# Altium PCB User_Interface.PcbDoc
Units mm, origin at the board's own origin, x right, y up, seen from the top; angles counter-clockwise.
Board outline 200 x 135 mm, 2 copper layers (Top Layer, Bottom Layer); 66 components, 48 nets, 170 pads, 7 vias.
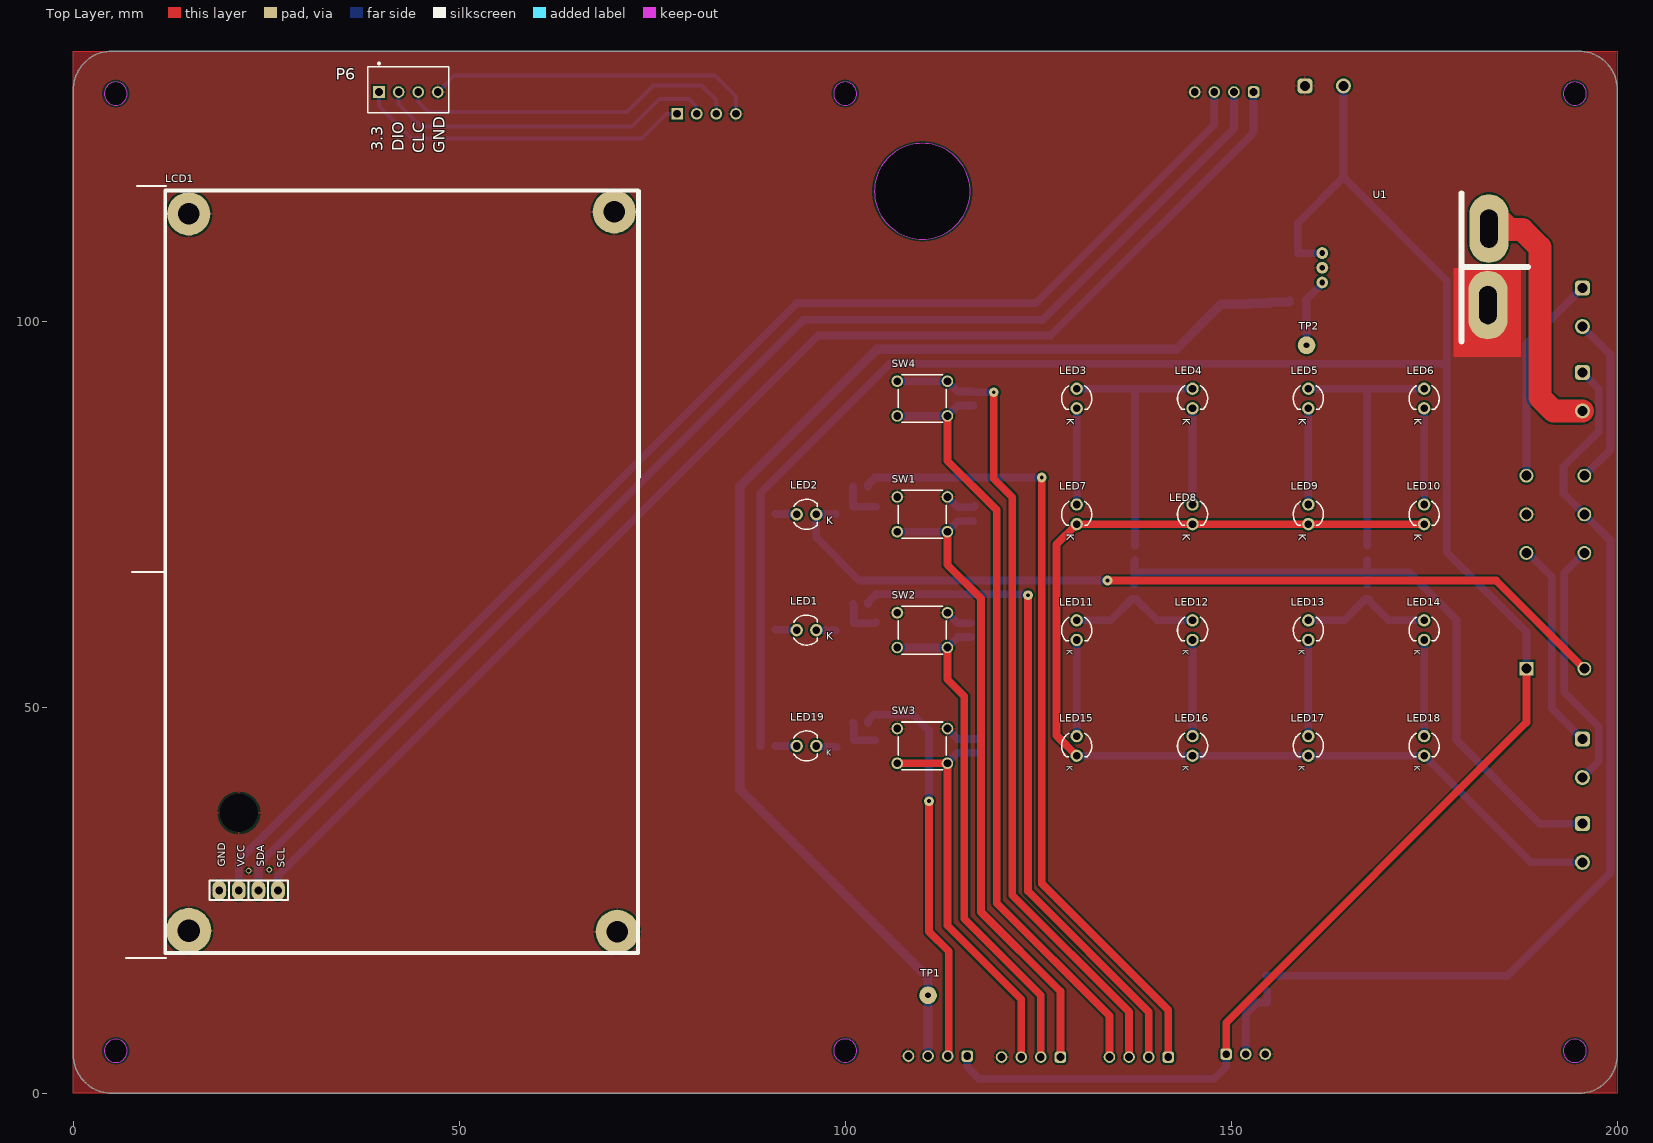
[diagram p0: Top Layer view]
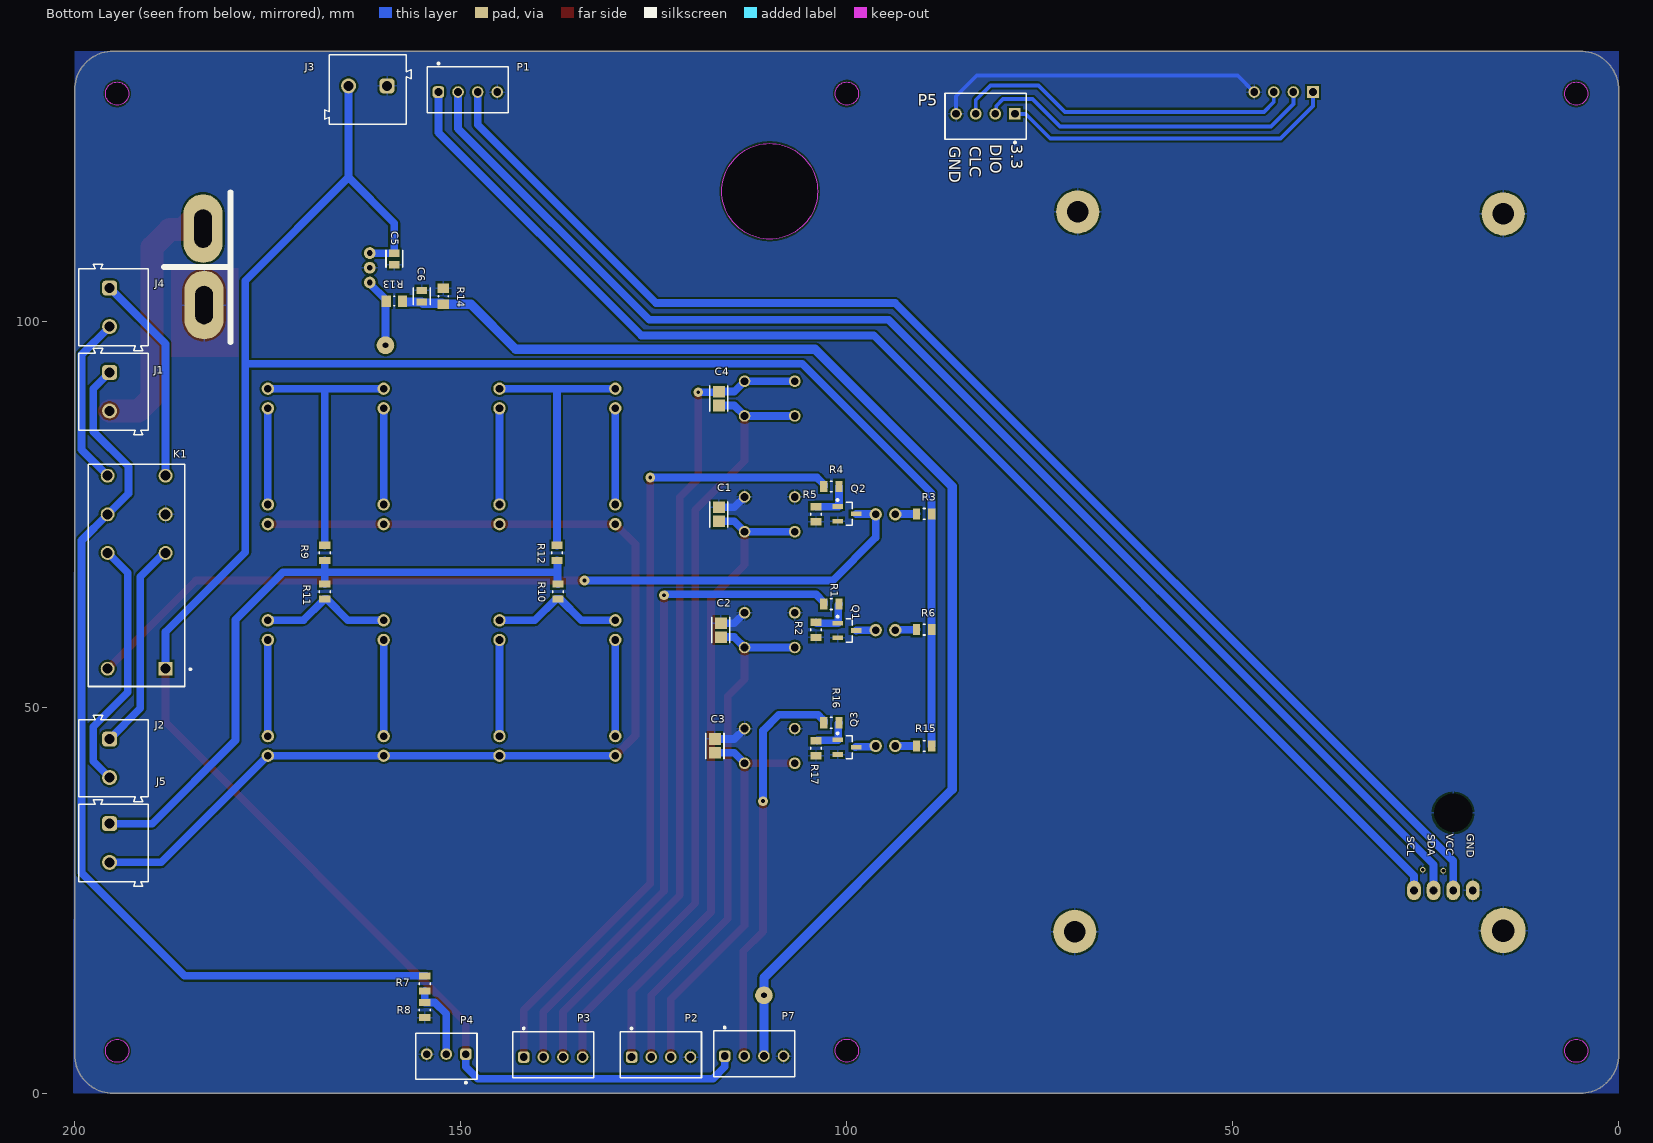
[diagram p1: Bottom Layer view, seen from below]
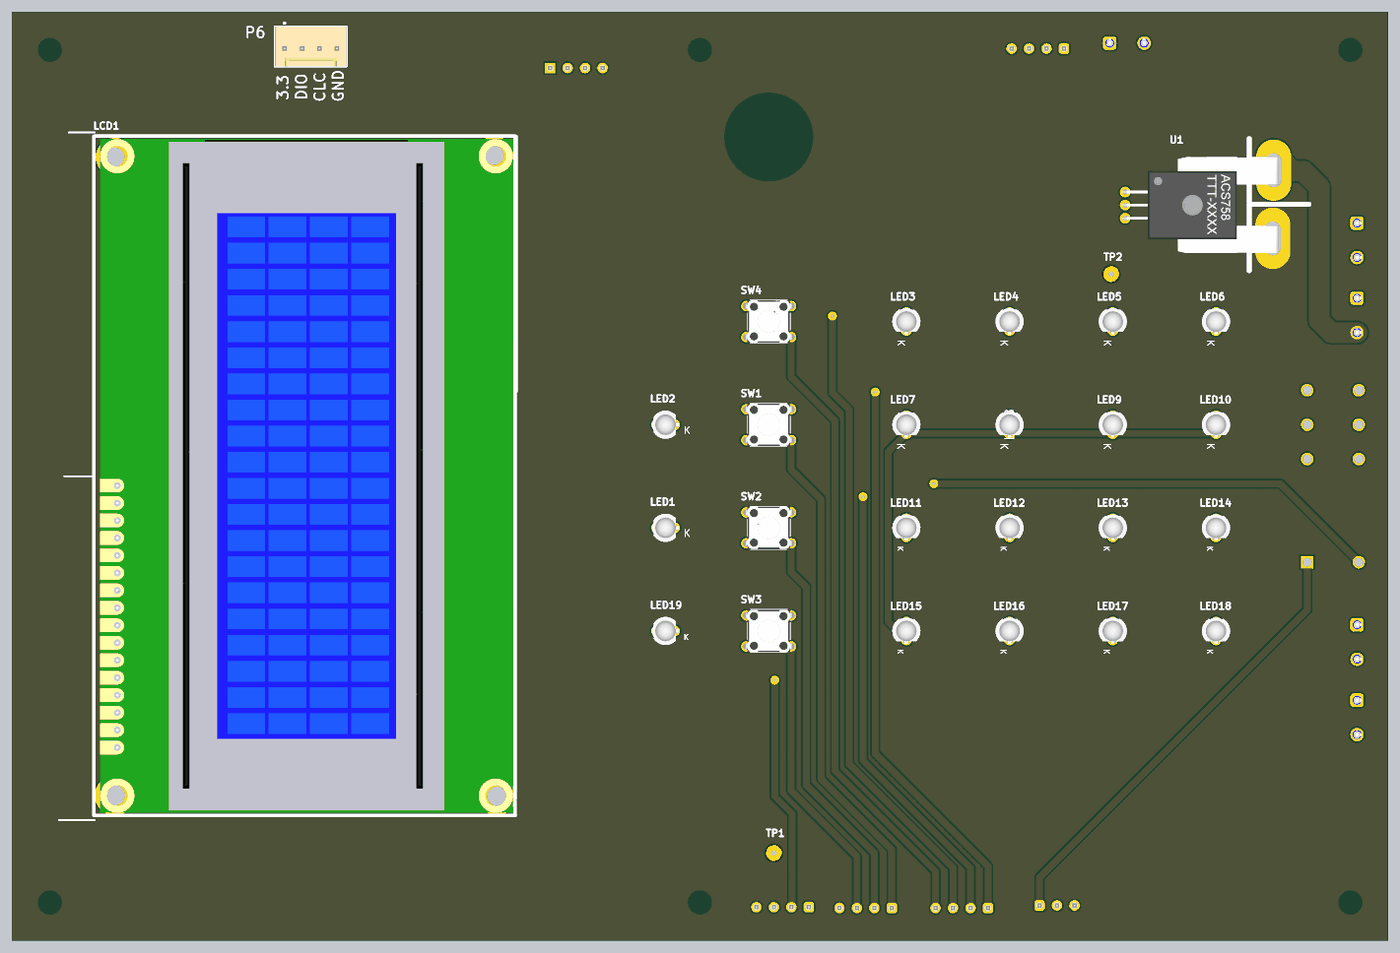
[diagram p2: 3D render of the assembled board from above, using the file's embedded part models]
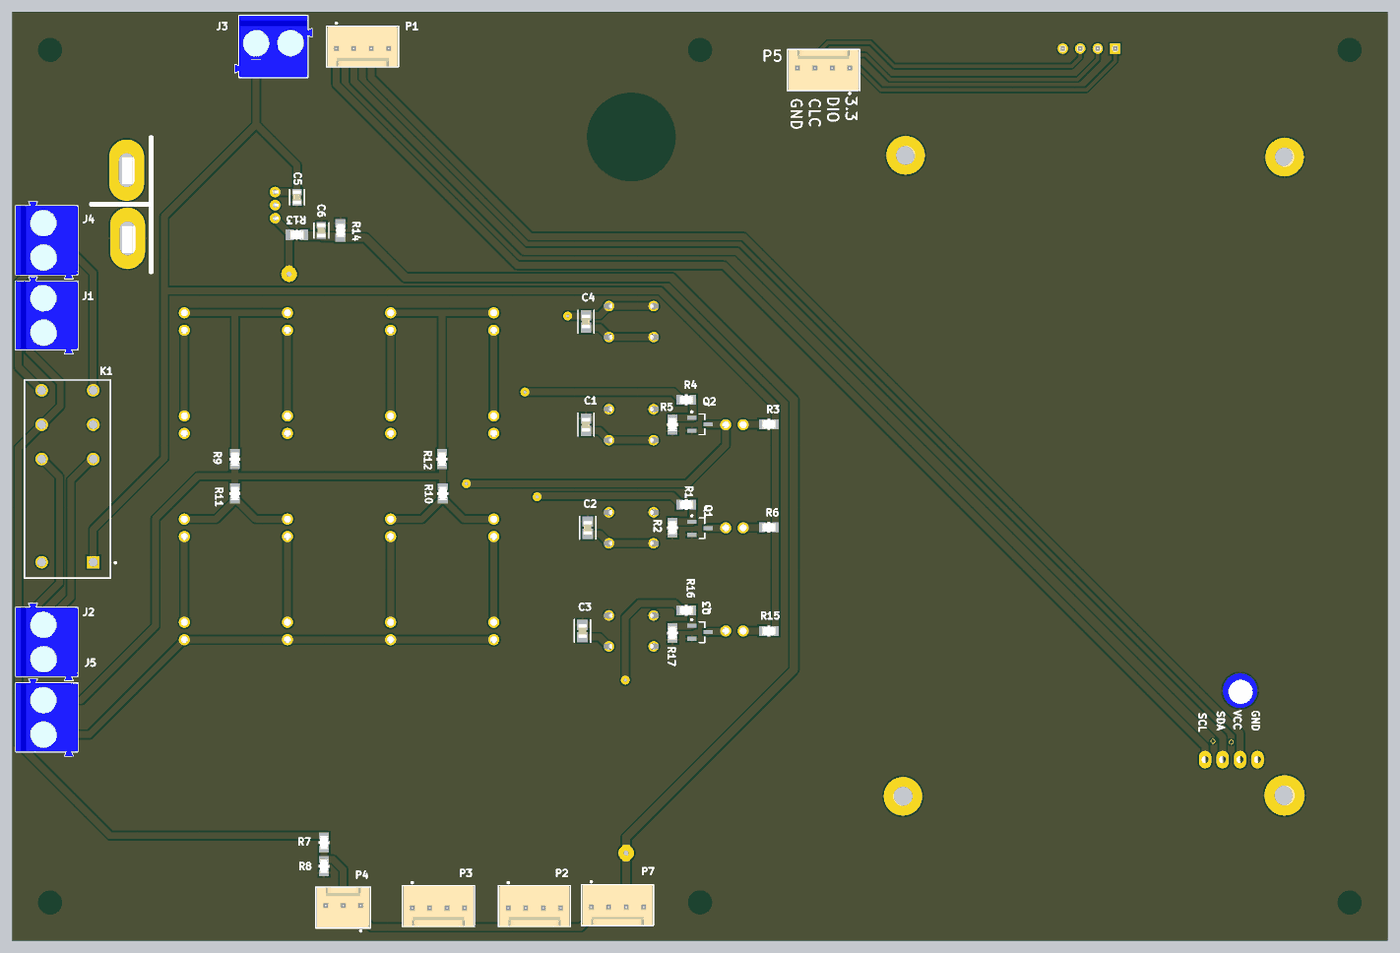
[diagram p3: 3D render of the assembled board from below, using the file's embedded part models]

## Layer stack, top to bottom
Top Solder: solder mask 0.0102, Solder Resist, Dk 3.5
Top Layer: signal copper 0.0356
Dielectric 1: dielectric 0.32, FR-4, Dk 4.8
Bottom Layer: signal copper 0.0356
Bottom Solder: solder mask 0.0102, Solder Resist, Dk 3.5

## Board outline
0.025,5 ccw(c5.025,5) 5.025,0 195.025,0 ccw(c195.025,5) 200.025,5 200.025,130 ccw(c195.025,130) 195.052,135 5.025,135 ccw(c5.025,130) 0.025,130
cut-out: 103.803,116.84 ccw(c110,116.84) 110,110.643 ccw(c110,116.84) 116.197,116.84 ccw(c110,116.84) 110,123.037 ccw(c110,116.84)
cut-out: 98.5,5.525 ccw(c100,5.525) 100,4.025 ccw(c100,5.525) 101.5,5.525 ccw(c100,5.525) 100,7.025 ccw(c100,5.525)
cut-out: 98.5,129.5 ccw(c100,129.5) 100,128 ccw(c100,129.5) 101.5,129.5 ccw(c100,129.5) 100,131 ccw(c100,129.5)
cut-out: 4.025,5.5 ccw(c5.525,5.5) 5.525,4 ccw(c5.525,5.5) 7.025,5.5 ccw(c5.525,5.5) 5.525,7 ccw(c5.525,5.5)
cut-out: 193.025,5.5 ccw(c194.525,5.5) 194.525,4 ccw(c194.525,5.5) 196.025,5.5 ccw(c194.525,5.5) 194.525,7 ccw(c194.525,5.5)
cut-out: 193.025,129.5 ccw(c194.525,129.5) 194.525,128 ccw(c194.525,129.5) 196.025,129.5 ccw(c194.525,129.5) 194.525,131 ccw(c194.525,129.5)
cut-out: 4.025,129.5 ccw(c5.525,129.5) 5.525,128 ccw(c5.525,129.5) 7.025,129.5 ccw(c5.525,129.5) 5.525,131 ccw(c5.525,129.5)

## Design rules (kind name [scope] priority, off if disabled: settings)
Clearance [All] p1: gap=0.254 ignorepadtopadclearanceinfootprint=FALSE except(0: Arc-Hole Track-Hole SMDPad-Hole THPad-Hole Via-Hole Fill-Hole Poly-Hole Region-Hole Text-Hole)
PlaneClearance [All] p1: clearance=0.2
PolygonConnect [All] p1: connectstyle=Relief reliefconductorwidth=0.254 reliefentries=4 polygonreliefangle="90 Angle" airgapwidth=0.254
RoomDefinition User_Interface [InComponentClass('User_Interface')] p1: confinementstyle=ConfineIn formatcopy=TRUE lockcomponents=FALSE outline -211.963,-11.303 226.06,-11.303 226.06,150.749 -211.963,150.749
RoutingVias [All] p1: holewidth=0.7 width=1.27 viastyle="Through Hole" minholewidth=0.7 minwidth=1.27 maxholewidth=0.7 maxwidth=1.27
SilkToSilkClearance [All] p1: silktosilkclearance=0.1
SilkToSolderMaskClearance [IsPad] p1: minsilkscreentomaskgap=0.05 clearancetoexposedcopper=FALSE
SolderMaskExpansion [All] p1: expansion=0 istentingtop=FALSE
Width [All] p1: maxlimit=5 minlimit=0.254 preferedwidth=0.5 minimp=50.000000 maximp=50.000000 favimp=50.000000
27 further rules are at their usual default settings.

## Components (designator, comment, footprint, x,y, rotation, side; value= is the part's Value field where it differs from the comment)
C1 "C0805C224K5RACTU" FP-C0805C-DN-IPC_A 116.586,75 r270 bottom locked value="0.22 μF"
C2 "C0805C224K5RACTU" FP-C0805C-DN-IPC_A 116.332,60 r270 bottom locked value="0.22 μF"
C3 "C0805C224K5RACTU" FP-C0805C-DN-IPC_A 117.094,45 r270 bottom locked value="0.22 μF"
C4 "C0805C224K5RACTU" FP-C0805C-DN-IPC_A 116.586,90 r90 bottom locked value="0.22 μF"
C5 "C0805C224K5RACTU" FP-C0805C-DN-MFG 158.623,108.077 r270 bottom value="0.22 μF"
C6 "0.22uF" FP-C0805C-DN-MFG 155.067,103.251 r270 bottom value="0.22 μF"
J1 "691101710002" 691101710002 195,90.892 r270 bottom
J2 "691101710002" 691101710002 195,43.394 r270 bottom
J3 "691101710002" 691101710002 162.052,130 r0 bottom locked
J4 "691101710002" 691101710002 195,101.814 r270 bottom
J5 "691101710002" 691101710002 195,32.425 r270 bottom
K1 "G2RL-24-DC24" OMRON-G2RL-24_V 192,67.5 r90 bottom
LCD1 "2004_I2C" LCD2004_I2C 49.911,84.836 r90 top locked
LED1 "151033BS03000" "Type 3mm" 95,60 r0 top locked
LED2 "151033BS03000" "Type 3mm" 95,75 r0 top locked
LED3 "151033BS03000" "Type 3mm" 130,90 r270 top
LED4 "151033BS03000" "Type 3mm" 145,90 r270 top
LED5 "151033BS03000" "Type 3mm" 160,90 r270 top
LED6 "151033BS03000" "Type 3mm" 175,90 r270 top
LED7 "151033BS03000" "Type 3mm" 130,75 r270 top
LED8 "151033BS03000" "Type 3mm" 145,75 r270 top
LED9 "151033BS03000" "Type 3mm" 160,75 r270 top
LED10 "151033BS03000" "Type 3mm" 175,75 r270 top
LED11 "151033BS03000" "Type 3mm" 130,60 r270 top
LED12 "151033BS03000" "Type 3mm" 145,60 r270 top
LED13 "151033BS03000" "Type 3mm" 160,60 r270 top
LED14 "151033BS03000" "Type 3mm" 175,60 r270 top
LED15 "151033BS03000" "Type 3mm" 130,45 r270 top
LED16 "151033BS03000" "Type 3mm" 145,45 r270 top
LED17 "151033BS03000" "Type 3mm" 160,45 r270 top
LED18 "151033BS03000" "Type 3mm" 175,45 r270 top
LED19 "151033BS03000" "Type 3mm" 95,45 r0 top locked
P1 "61900411121" 61900411121#1 149.098,130 r0 bottom locked
P2 "61900411121" 61900411121#1 124.079,5 r0 bottom locked
P3 "61900411121" 61900411121#1 138.049,5 r0 bottom locked
P4 "61900311121" 61900311121 151.892,4.78 r180 bottom
P5 "61900411121" 61900411121#2 82.042,126.573 r180 bottom
P6 "61900411121" 61900411121#2 43.434,130 r180 top locked
P7 "61900411121" 61900411121#1 112.014,5.126 r0 bottom
Q1 "BC847B" INF-SOT23_M 100,59.944 r180 bottom locked
Q2 "BC847B" INF-SOT23_M 100,75.057 r180 bottom locked
Q3 "BC847B" INF-SOT23_M 100,44.831 r180 bottom locked
R1 "1K" FP-CRCW0805-e3-MFG 102,63.373 r180 bottom locked
R2 "10K" FP-CRCW0805-e3-MFG 104,60.03 r90 bottom locked
R3 "200" FP-CRCW0805-e3-MFG 90,75.057 r180 bottom locked
R4 "1K" FP-CRCW0805-e3-MFG 102,78.613 r180 bottom locked
R5 "10K" FP-CRCW0805-e3-MFG 104,75.016 r90 bottom locked
R6 "200" FP-CRCW0805-e3-MFG 90,60.071 r180 bottom locked
R7 "10K" FP-CRCW0805-e3-MFG 154.686,14.224 r90 bottom
R8 "1K" FP-CRCW0805-e3-MFG 154.686,10.795 r90 bottom
R9 "200" FP-CRCW0805-e3-MFG 167.64,70 r270 bottom
R10 "200" FP-CRCW0805-e3-MFG 137.414,65 r90 bottom
R11 "200" FP-CRCW0805-e3-MFG 167.64,65 r90 bottom
R12 "200" FP-CRCW0805-e3-MFG 137.541,70 r270 bottom
R13 "10K" Vishay_CRCW0805-e3_IPC_A 158.623,102.616 r0 bottom
R14 "2.2K" Vishay_CRCW0805-e3_IPC_A 152.273,103.251 r270 bottom
R15 "200" FP-CRCW0805-e3-MFG 90,45 r180 bottom
R16 "1K" FP-CRCW0805-e3-MFG 102,48.006 r180 bottom locked
R17 "10K" FP-CRCW0805-e3-MFG 104,44.704 r90 bottom locked
SW1 "430156043726" 4301x60437x6 110,75 r0 top locked
SW2 "430156043726" 4301x60437x6 110,60 r0 top locked
SW3 "430156043726" 4301x60437x6 110,45 r0 top locked
SW4 "430156043726" 4301x60437x6 110,90 r180 top locked
TP1 "Test_Point_PCB" Test_Point 110.744,12.7 r0 top
TP2 "Test_Point_PCB" Test_Point 159.766,96.901 r0 top
U1 "ACS758" ACS758-100 171.577,106.807 r270 top

## Footprints (in the part's own frame and the unit in brackets; to place one, negate y for a bottom-side part, rotate by r counter-clockwise, add the part's x,y. Pads: shape width x height; smd on the part's side, far side on the other; paste and mask are expansions set on the pad)
4301x60437x6 [mm] "6x6mm Tact Switch, THT version"
  round 1.5 hole 1: A1(-3.25,2.25) A2(3.25,2.25) B1(-3.25,-2.25) B2(3.25,-2.25)
  silkscreen extent -3.1,-3.1 3.1,3.1, body extent -3.95,-3.1 3.95,3.1, height 4.35
61900311121 [mm] "2.54mm Male Locking Header, 3p"
  rrect50% 1.5x1.5 hole 1: 1(2.54,0.3)
  round 1.5 hole 1: 2(0,0.3) 3(-2.54,0.3)
  silkscreen extent -3.98,-3.52 3.98,2.98, body extent -3.81,-2.9 3.81,2.9, height 11.53
61900411121#1 [mm] "2.54mm Male Locking Header, 4p"
  rrect50% 1.5x1.5 hole 1: 1(3.81,0.3)
  round 1.5 hole 1: 2(1.27,0.3) 3(-1.27,0.3) 4(-3.81,0.3)
  silkscreen extent -5.25,-3.52 5.25,2.98, body extent -5.08,-2.9 5.08,2.9, height 11.53
61900411121#2 [mm] "2.54mm Male Locking Header, 4p"
  rect 1.5x1.5 hole 1: 1(3.81,0.3)
  round 1.5 hole 1: 2(1.27,0.3) 3(-1.27,0.3) 4(-3.81,0.3)
  silkscreen extent -5.25,-3.52 5.25,2.98, body extent -5.08,-2.9 5.08,2.9, height 11.53
691101710002 [mm] "5,00mm - modular - blue - Horizontal entry with pressure clamp - 12,6mm height - 02p"
  rrect50% 1.95x1.95 hole 1.3: 1(-2.5,-0.5)
  round 1.95 hole 1.3: 2(2.5,-0.5)
  silkscreen extent -5.6,-4.5 5.6,4.5, body extent -5.6,-4.5 5.6,4.5, height 12.65
ACS758-100 [mil]
  round 60 hole 30: 1(-80,-385) 2(-5,-385) 3(70,-385)
  oval 350x200 hole 90 slot 195 at 0 deg: 4(185,460) 5(-205,465)
  silkscreen extent -385,325 370,665, body extent -281,-404 271,492, height 280
FP-C0805C-DN-IPC_A [mm]
  rect 1.505x1.556 smd paste+0 mask+0: 1(-0.901,0) 2(0.901,0)
  silkscreen extent -1.65,-1.18 1.65,1.18, body extent -1,-0.63 1,0.63, height 0.88
FP-C0805C-DN-MFG [mm]
  rect 0.95x1.35 smd paste+0 mask+0: 1(-0.75,0) 2(0.75,0)
  silkscreen extent -1.1,-1.07 1.1,1.07, body extent -1,-0.63 1,0.63, height 0.88
FP-CRCW0805-e3-MFG [mm]
  rect 0.95x1.45 smd paste+0 mask+0: 1(-0.975,0) 2(0.975,0)
  silkscreen extent -0.13,-0.7 0.13,0.7, body extent -1,-0.63 1,0.63, height 0.5
INF-SOT23_M [mm] "SOT23, 3-Leads, Body 2.9x1.3 mm, Pitch 0.95 mm, IPC Low Density"
  rect 1.35x0.6 smd: 1(-1.2,0.95) 2(-1.2,-0.95) 3(1.2,0)
  silkscreen extent -1.33,-1.5 0.7,1.92, body extent -0.7,-1.5 0.7,1.5, height 1.1
LCD2004_I2C [mil]
  round 220 hole 110: 0(-2515,-810) 0(1145,1375) 0(1155,-795)
  round 230 hole 115: 0(-2510,1375)
  round 60 hole 196.85 unplated: 0(-1910,1120)
  oval 100x70 hole 40: 1(-2305,1220) 2(-2305,1120) 3(-2305,1020) 4(-2305,920)
  silkscreen extent -2625,-915 1265,1495, body extent -2610,-902 1248,1460, height 913
OMRON-G2RL-24_V [mm] "THD, 8-Leads, Body 28.8x12.5mm"
  rect 1.8x1.8 hole 1.3: 1(-12.5,-3.75)
  round 1.8 hole 1.3: 2(2.5,-3.75) 3(7.5,-3.75) 4(12.5,-3.75) 5(12.5,3.75) 6(7.5,3.75) 7(2.5,3.75) 8(-12.5,3.75)
  silkscreen extent -14.8,-7.1 14,6.25, body extent -14.8,-6.25 14,6.25, height 15.7
Test_Point [mil]
  round 90 hole 30 unplated paste+4 mask+4: 1(0,0)
"Type 3mm" [mm] "THT, LED-3mm, 2pin- Body 4.15mm(max)"
  round 1.6 hole 1: 1(1.27,0) 2(-1.27,0)
  silkscreen extent -1.66,-1.95 1.4,1.95, body extent -1.93,-1.94 1.87,1.94, height 10.5
Vishay_CRCW0805-e3_IPC_A [mil]
  rect 47.5x59.38 smd paste+0 mask+0: 1(-41.37,0) 2(41.37,0)
  silkscreen extent -3,-25 3,25, body extent -39,-25 39,25, height 20

## Part data
C1 C2 C3 C4 C5: library part CMP-1036-04552-2, "CAP CER 0.22UF 50V X7R 0805", Capacitance="0.22 μF", Manufacturer=KEMET, Package=C0805C-DN, Temperature="-55°C to +125°C", Temperature Characteristic=X7R, Temperature Coefficient=30ppm/°C, Temperature Range High=+125°C, Temperature Range Low=-55°C, Tolerance=0.1, Voltage Rating="50 V", Automotive=No, Category=Cap, ComponentLink2Description=Datasheet, ComponentLink2URL=https://content.kemet.com/datasheets/KEM_C1003_C0G_SMD.pdf, Device Class L1="Passive Components", Device Class L2=Capacitors, Device Class L3="Ceramic Capacitors", Digikey Description="CAP CER 0.22UF 50V X7R 0805", Height=0.88mm, Ipc Land Pattern Name=CAPC200125X78, Lead Free=Yes, Manufacturer Part Number=C0805C224K5RACTU, Material=Ceramic, Mouser Description="CAP CER 0.22UF 50V X7R 0805", Octopart=https://octopart.com/c0805c224k5ractu-kemet-144670, RoHS=TRUE
C6: library part CMP-1036-04552-2, "CAP CER 0.22UF 50V X7R 0805", Capacitance="0.22 μF", Manufacturer=KEMET, Manufacturer Part Number=C0805C224K5RACTU, Package=C0805C-DN, Temperature="-55°C to +125°C", Temperature Characteristic=X7R, Temperature Coefficient=30ppm/°C, Temperature Range High=+125°C, Temperature Range Low=-55°C, Tolerance=0.1, Voltage Rating="50 V", Automotive=No, Category=Cap, ComponentLink2Description=Datasheet, ComponentLink2URL=https://content.kemet.com/datasheets/KEM_C1003_C0G_SMD.pdf, Device Class L1="Passive Components", Device Class L2=Capacitors, Device Class L3="Ceramic Capacitors", Digikey Description="CAP CER 0.22UF 50V X7R 0805", Height=0.88mm, Ipc Land Pattern Name=CAPC200125X78, Lead Free=Yes, Material=Ceramic, Mouser Description="CAP CER 0.22UF 50V X7R 0805", Octopart=https://octopart.com/c0805c224k5ractu-kemet-144670, RoHS=TRUE
J1 J2 J3 J4 J5: "WR-TBL Series 101 Horizontal Entry Modular, THT, pitch 5mm, 2p", Manufacturer="Wurth Elektronik", Operating Temperature Max=105°C, Operating Temperature Min=-40°C, Rated Current=16A, Working Voltage=250V, Application="Pressure Clamp", Category="Terminal Blocks", ComponentLink1Description="Website Link", ComponentLink1URL=https://www.we-online.com/redexpert/article/691101710002?ad, ComponentLink2Description="Datasheet Link", ComponentLink2URL=https://www.we-online.com/redexpert/spec/691101710002?ad, Manufacturer Part Number=691101710002, Match Code=WR-TBL, Modularity=Yes, Mount="Through Hole", Number of Pins=2, Number of Rows=1, Orientation=Horizontal, Packaging=Box, Pitch=5mm
K1: library part CMP-2000-06305-1, "Low Profile Power Relay with 15.7 mm Height, Ideal for Incorporation in Miniature Equipment, 24 V, -40 to 85 degC, 8-Pin THD, RoHS, Bulk", Coil Current=16.7mA, Coil Resistance=1.44kOhms, Coil Voltage=24V, Manufacturer=Omron, Package Description="8-Pin Through Hole Device, Body 28.8 x 12.5 mm", Package Reference=G2RL-24, Power Consumption=400mW, Brand=OmronElectronics, Coil Type=Non-Latching, Contact Form=DPDT(2FormC), Contact Material=SilverNickel, Contact Termination=Pin, Datasheet URL=http://www.omron.com/ecb/products/pdf/en-g2rl.pdf, Datasheet Version=03/2016, Factory Pack Quantity=20, Height=15.7mm, Length=29mm, Manufacturer URL=http://www.omron.com/, Mounting Style=ThroughHole, Mounting Technology=ThroughHole, Product=PowerRelays, Product Category=GeneralPurposeRelays, RoHS=Details, Series=G2RL-2, Type=HighCurrent, Width=12.7mm
LCD1: library part LCD2004_I2C
LED1 LED2 LED3 LED4 LED5 LED6 LED7 LED8 LED9 LED10 LED11 LED12 LED13 LED14 LED15 LED16 LED17 LED18 LED19: "THT LED round mono-color waterclear, WL-TMRW , Blue", Emitting color=Blue, Manufacturer="Wuerth Elektronik", ComponentLink1Description="Manufacturer URL", ComponentLink1URL=http://www.we-online.com, ComponentLink2Description=Datasheet, ComponentLink2URL=http://katalog.we-online.de/pbs/datasheet/7448042001.pdfhttp://katalog.we-online.de/pbs/datasheet/7448042001.pdfhttp://katalog.we-online.de/pbs/datasheet/7448042001.pdfhttp://katalog.we-online.de/pbs/datasheet/151033BS03000.pdf, PackageReference="Type 3mm", PartNumber=151033BS03000
P1 P2 P3 P7: "WR-WTB THT Male Vertical Locking Header, pitch 2.54mm, 4pins", Contact Resistance=20mΩ, Manufacturer="Wurth Elektronik", Operating Temperature Max=105°C, Operating Temperature Min=-40°C, Rated Current=3A, Withstanding Voltage=1000VAC, Working Voltage=250VAC, Category="Wire-to-Board Connectors", ComponentLink1Description="Website Link", ComponentLink1URL=https://www.we-online.com/redexpert/article/61900411121?ad, ComponentLink2Description="Datasheet Link", ComponentLink2URL=https://www.we-online.com/redexpert/spec/61900411121?ad, Gender=Male, Height=11.5mm, Length=10.16mm, Manufacturer Part Number=61900411121, Match Code=WR-WTB, Mount="Through Hole", Number of Pins=4, Number of Rows=1, Orientation=Vertical, Packaging=Bag, Pitch=2.54mm, Width=5.8mm
P4: "WR-WTB THT Male Vertical Locking Header, pitch 2.54mm, 3pins", Contact Resistance=20mΩ, Manufacturer="Wurth Elektronik", Operating Temperature Max=105°C, Operating Temperature Min=-40°C, Rated Current=3A, Withstanding Voltage=1000VAC, Working Voltage=250VAC, Category="Wire-to-Board Connectors", ComponentLink1Description="Website Link", ComponentLink1URL=https://www.we-online.com/redexpert/article/61900311121?ad, ComponentLink2Description="Datasheet Link", ComponentLink2URL=https://www.we-online.com/redexpert/spec/61900311121?ad, Gender=Male, Height=11.5mm, Length=7.62mm, Manufacturer Part Number=61900311121, Match Code=WR-WTB, Mount="Through Hole", Number of Pins=3, Number of Rows=1, Orientation=Vertical, Packaging=Bag, Pitch=2.54mm, Width=5.8mm
P5 P6: "WR-WTB THT Male Vertical Locking Header, pitch 2.54mm, 4p", Contact Resistance=20mOhm, Operating Temperature="-40 to +105degC", Rated Current=3A, Withstanding Voltage=1000VAC, Working Voltage=250VAC, ComponentLink1Description=Manufacturer, ComponentLink1URL=http://www.we-online.de, ComponentLink2Description=Datasheet, ComponentLink2URL=https://www.we-online.com/catalog/datasheet/61900411121.pdf, Gender=Male, Mounting Technology=THT, Packaging=Bag, Part Number=61900411121, Pin Number=4, Pitch=2.54mm, Published Date="January 2020", Publisher="Wurth Elektronik", Type=Vertical
Q1 Q2 Q3: library part CMP-1177-00042-1, "NPN Silicon AF Transistor, 45 V VCEO, 100 mA IC, SOT23, Reel, Green", Manufacturer=Infineon, ComponentLink1Description="Manufacturer URL", ComponentLink1URL=http://www.infineon.com/, ComponentLink2Description=Datasheet, ComponentLink2URL=http://www.infineon.com/dgdl/bc847series_bc848series_bc849series_bc850series.pdf?folderId=db3a304314dca389011541d30fa21656&fileId=db3a304314dca389011541d4630a1657, ComponentLink3Description="Package Specification", ComponentLink3URL=http://www.infineon.com/dgdl/SOT23-Package_Overview.pdf?folderId=db3a30431936bc4b0119532290053c66&fileId=db3a30431936bc4b0119533468123c85, fT (typ)="250Â MHz", Green=TRUE, IBM (max)="200Â mA", IC (max)="100Â mA", ICBO (max)="15Â nA", ICM (max)="200Â mA", Mounting Technology="Surface Mount", PackageDescription="3-Pin Small Outline Transistor Package, 1.3 x 2.9 mm Body, 0.95 mm Pitch", PackageReference=SOT23, PackageVersion=Apr-08, Packing=Reel, PartNumber=BC847B, Polarity=NPN, Ptot (max)="330Â mW", VCBO (max)="50Â V", VCEO (max)="45Â V", VEBO (max)="6Â V"
R1 R2 R5 R7 R16 R17: library part CMP-2001-04908-2, "RES Thick Film, 10kΩ, 1%, 0.125W, 100ppm/°C, 0805", Case Code (Imperial)=0805, Case Code (Metric)=2012, Max Operating Temperature=155°C, Min Operating Temperature=-55°C, Package Quantity=5000, Power Rating=125mW, Resistance=10kR, Temperature Coefficient=100ppm/°C, Tolerance=1%, Voltage Rating=150V, Case/Package=0805, Composition="Thick Film", Contact Plating=Tin, Depth=1.25mm, Height=0.45mm, Lead Free="Lead Free", Length=2mm, Military Standard=Not, Packaging="Tape and Reel", Radiation Hardening=No, Termination=SMD/SMT, Voltage Rating (DC)=150V, Weight=0.000194oz, Width=1.25mm
R3 R6 R9 R10 R11 R12 R15: library part CMP-2001-04908-2, "RES Thick Film, 200Ω, 1%, 0.125W, 100ppm/°C, 0805", Case Code (Imperial)=0805, Case Code (Metric)=2012, Max Operating Temperature=155°C, Min Operating Temperature=-55°C, Package Quantity=5000, Power Rating=125mW, Resistance=10kR, Temperature Coefficient=100ppm/°C, Tolerance=1%, Voltage Rating=150V, Case/Package=0805, Composition="Thick Film", Contact Plating=Tin, Depth=1.25mm, Height=0.45mm, Lead Free="Lead Free", Length=2mm, Military Standard=Not, Packaging="Tape and Reel", Radiation Hardening=No, Termination=SMD/SMT, Voltage Rating (DC)=150V, Weight=0.000194oz, Width=1.25mm
R4 R8: library part CMP-2001-04908-2, "RES Thick Film, 1kΩ, 1%, 0.125W, 100ppm/°C, 0805", Case Code (Imperial)=0805, Case Code (Metric)=2012, Max Operating Temperature=155°C, Min Operating Temperature=-55°C, Package Quantity=5000, Power Rating=125mW, Resistance=10kR, Temperature Coefficient=100ppm/°C, Tolerance=1%, Voltage Rating=150V, Case/Package=0805, Composition="Thick Film", Contact Plating=Tin, Depth=1.25mm, Height=0.45mm, Lead Free="Lead Free", Length=2mm, Military Standard=Not, Packaging="Tape and Reel", Radiation Hardening=No, Termination=SMD/SMT, Voltage Rating (DC)=150V, Weight=0.000194oz, Width=1.25mm
R13 R14: library part RC0805FR-07100KL
SW1 SW2 SW3 SW4: "WS-TATV THT Tact Switch 6x6mm, SPST-NO, 12VDC, 50mA, 260g", Manufacturer="Wurth Elektronik", Operating Temperature Max=85°C, Operating Temperature Min=-40°C, Rated Current=50mA, Rated Voltage=12VDC, Category="Tact Switches", Circuit=SPST-NO, ComponentLink1Description="Website Link", ComponentLink1URL=https://www.we-online.com/redexpert/article/430156043726?ad, ComponentLink2Description="Datasheet Link", ComponentLink2URL=https://www.we-online.com/redexpert/spec/430156043726?ad, Contact Material="Stainless Steel", Contact Plating=Silver, Height=4.3mm, Length=6mm, Manufacturer Part Number=430156043726, Match Code=WS-TATV, Mount="Through Hole", Operation Force=260g, Packaging=Bulk, Terminal Material="Copper Alloy", Terminal Plating=Silver, Washable=No, Width=6mm
TP1 TP2: library part TP_PCB?, "Test_Point"

## Via types
v1: diameter 1.27, hole 0.5, Top Layer to Bottom Layer, 5 vias
v2: diameter 0.7, hole 0.5, Top Layer to Bottom Layer, 2 vias

## Nets (pads, with @x,y where several pads share a name; then routed paths per layer and width w, separated by ;. In a path a pad name is that pad's centre, name@x,y a point inside that pad or via, vN(x,y) a via of type N, cw(c..) or ccw(c..) an arc to the next point about the centre after c; other vN are vias at no path point)
+5: C5.1 J3.2 K1.1 P4.1 P7.1 R3.2 R6.2 R15.2 U1.1 | length 333.2
  Top Layer w1: P4.1 149.352,9.144 188.25,48.042 K1.1
  Bottom Layer w1: R15.2 R6.2 R3.2 89.025,77.722 105.791,94.488 177.927,94.488 ; P7.1 115.826,4.824 115.826,3.427 117.348,1.905 147.828,1.905 149.352,3.429 P4.1 ; U1.1 161.792,108.833 158.629,108.833 C5.1 158.623,112.714 164.552,118.643 ; J3.2 164.552,118.643 ; K1.1 188.25,59.781 177.927,70.104 177.927,94.488 ; 164.552,118.643 177.927,105.267 177.927,94.488
GND: C1.1 C2.1 C3.1 C5.2 C6.1 J3.1 K1.3 LCD1.0 LCD1.1 P1.4 P2.4 P4.3 P5.4 P6.4 P7.4 Q1.2 Q2.2 Q3.2 R2.1 R5.1 R8.1 R14.1 R17.1 SW1.A1 SW1.A2 SW2.A1 SW2.A2 SW3.A1 SW3.A2 U1.2 U1.4 | length 55.1
  Bottom Layer w0.5: P6.4 49.37,131.826 83.185,131.826 85.852,129.159 P5.4
  Bottom Layer w1: SW3.A2 114.599,45.901 C3.1 ; SW2.A2 114.599,60.901 C2.1 ; SW1.A2 114.599,75.901 C1.1 C1.1@116.758,76.073
  other v2: 22.733,28.829 25.4,28.956
NetC1_2: C1.2 P2.1 SW1.B1 SW1.B2 | length 84.5
  Top Layer w1: SW1.B2 113.25,68.487 117.602,64.135 117.602,23.495 127.889,13.208 P2.1
  Bottom Layer w1: SW1.B1 SW1.B2 114.599,74.099 C1.2
NetC2_2: C2.2 P2.2 SW2.B1 SW2.B2 | length 68.2
  Top Layer w1: SW2.B2 113.25,53.628 115.443,51.435 115.443,22.606 125.349,12.7 P2.2
  Bottom Layer w1: SW2.B1 SW2.B2 114.599,59.099 C2.2
NetC3_2: C3.2 P2.3 SW3.B1 SW3.B2 | length 52.9
  Top Layer w1: SW3.B1 SW3.B2 113.25,21.751 122.809,12.192 P2.3
  Bottom Layer w1: SW3.B2 114.599,44.099 C3.2
NetC4_1: C4.1 P3.4 SW4.A1 SW4.A2 | length 102.1
  Top Layer w1: SW4.A1 113.25,81.949 119.634,75.565 119.634,24.638 134.239,10.033 P3.4
  Bottom Layer w1: SW4.A2 SW4.A1 114.599,89.099 C4.1
NetC4_2: C4.2 P3.3 SW4.B1 SW4.B2 | length 106.5
  Top Layer w1: v1(119.253,90.805) 119.253,79.629 121.666,77.216 121.666,25.654 136.779,10.541 P3.3
  Bottom Layer w1: SW4.B2 SW4.B1 114.599,90.901 C4.2 116.682,90.805 v1(119.253,90.805)
NetC6_2: C6.2 P7.3 R13.1 R14.2 TP1.1 | length 165
  Bottom Layer w1.2: P7.3 TP1.1 110.744,14.986 86.36,39.37 86.36,78.613 104.14,96.393 142.875,96.393 148.682,102.2 R14.2 152.423,102.351 154.917,102.351 C6.2 157.457,102.501 R13.1
NetJ1_1: J1.1 K1.6 R7.2 | length 120.3
  Bottom Layer w1: R7.2@154.467,15.24 185.801,15.24 199.136,28.575 199.136,71.614 K1.6 193.04,77.71 193.04,81.153 197.612,85.725 197.612,91.28 J1.1
NetJ1_2: J1.2 U1.5 | length 32.8
  Top Layer w3: U1.5@184.476,113.484 186.073,111.887 187.706,111.887 189.992,109.601 189.992,90.149 191.749,88.392 J1.2
NetJ2_1: J2.1 K1.2 | length 27.2
  Bottom Layer w1: K1.2 188.445,70 191.516,66.929 191.516,49.878 J2.1
NetJ2_2: J2.2 K1.7 | length 32.9
  Bottom Layer w1: J2.2 197.612,43.006 197.612,47.498 193.167,51.943 193.167,67.417 K1.7
NetJ4_1: J4.1 K1.4 | length 27.3
  Bottom Layer w1: K1.4 188.25,97.064 J4.1
NetJ4_2: J4.2 K1.5 | length 22.2
  Bottom Layer w1: J4.2 199.136,95.678 199.136,83.386 K1.5
NetJ5_1: J5.1 R9.2 R10.2 R11.2 R12.2 | length 86.8
  Bottom Layer w1: R10.2 137.477,66.038 137.477,67.5 ; R12.2 137.477,68.962 137.477,67.5 ; R11.2 167.64,67.5 ; R9.2 167.64,67.5 ; J5.1 189.992,34.925 179.197,45.72 179.197,61.341 173.038,67.5 167.64,67.5 ; 137.477,67.5 167.64,67.5
NetJ5_2: J5.2 LED7.1 LED8.1 LED9.1 LED10.1 LED15.1 LED16.1 LED17.1 LED18.1 | length 148.4
  Top Layer w1: LED15.1 127.381,46.349 127.381,71.111 LED7.1 LED8.1 LED9.1 LED10.1
  Bottom Layer w1: LED15.1 LED16.1 LED17.1 LED18.1 188.805,29.925 J5.2
NetK1_8: K1.8 LED2.1 Q2.3 | length 112.1
  Top Layer w1: v1(133.985,66.421) 184.329,66.421 K1.8
  Bottom Layer w1: Q2.3 98.771,75.028 96.298,75.028 LED2.1 96.27,72.005 101.854,66.421 v1(133.985,66.421)
NetLCD1_2: LCD1.2 P1.3 | length 173.9
  Bottom Layer w1: LCD1.2 21.463,30.099 93.726,102.362 124.714,102.362 147.828,125.476 P1.3
NetLCD1_3: LCD1.3 P1.2 | length 173.9
  Bottom Layer w1: LCD1.3 24.003,29.591 94.615,100.203 125.603,100.203 150.368,124.968 P1.2
NetLCD1_4: LCD1.4 P1.1 | length 173.4
  Bottom Layer w1: LCD1.4 26.543,28.194 96.52,98.171 126.619,98.171 152.908,124.46 P1.1
NetLED1_1: LED1.1 Q1.3 | length 2.6
  Bottom Layer w1: LED1.1 96.298,59.972 98.772,59.972 Q1.3
NetLED1_2: LED1.2 R6.1 | length 2.8
  Bottom Layer w1: R6.1 91.01,60.036 93.694,60.036 LED1.2
NetLED2_2: LED2.2 R3.1 | length 2.8
  Bottom Layer w1: R3.1 91.004,75.028 93.702,75.028 LED2.2
NetLED3_1: LED3.1 LED7.2 | length 12.5
  Bottom Layer w1: LED7.2 LED3.1
NetLED3_2: LED3.2 LED4.2 R12.1 | length 35.3
  Bottom Layer w1: LED3.2 137.5,91.27 ; R12.1 137.541,91.229 137.5,91.27 ; LED4.2 137.5,91.27
NetLED4_1: LED4.1 LED8.2 | length 12.5
  Bottom Layer w1: LED8.2 LED4.1
NetLED5_1: LED5.1 LED9.2 | length 12.5
  Bottom Layer w1: LED9.2 LED5.1
NetLED5_2: LED5.2 LED6.2 R9.1 | length 35.4
  Bottom Layer w1: LED5.2 167.5,91.27 ; R9.1 167.64,91.13 167.5,91.27 ; LED6.2 167.5,91.27
NetLED6_1: LED6.1 LED10.2 | length 12.5
  Bottom Layer w1: LED10.2 LED6.1
NetLED11_1: LED11.1 LED15.2 | length 12.5
  Bottom Layer w1: LED15.2 LED11.1
NetLED11_2: LED11.2 LED12.2 R10.1 | length 17.3
  Bottom Layer w1: LED11.2 134.409,61.27 137.164,64.025 R10.1 137.664,64.025 140.419,61.27 LED12.2
NetLED12_1: LED12.1 LED16.2 | length 12.5
  Bottom Layer w1: LED16.2 LED12.1
NetLED13_1: LED13.1 LED17.2 | length 12.5
  Bottom Layer w1: LED17.2 LED13.1
NetLED13_2: LED13.2 LED14.2 R11.1 | length 17.2
  Bottom Layer w1: LED13.2 164.635,61.27 167.39,64.025 R11.1 ; R11.1@167.865,64 167.865,63.8 170.395,61.27 LED14.2
NetLED14_1: LED14.1 LED18.2 | length 12.5
  Bottom Layer w1: LED18.2 LED14.1
NetLED19_1: LED19.1 Q3.3 | length 2.7
  Bottom Layer w1: LED19.1 96.389,44.881 98.826,44.881 Q3.3@98.876,44.831
NetLED19_2: LED19.2 R15.1 | length 2.8
  Bottom Layer w1: R15.1 LED19.2
NetP3_1: P3.1 R4.1 | length 105
  Top Layer w1: v1(125.476,79.756) 125.476,27.178 141.859,10.795 P3.1
  Bottom Layer w1: R4.1 102.975,78.863 103.2,79.088 103.868,79.756 v1(125.476,79.756)
NetP3_2: P3.2 R1.1 | length 87.7
  Top Layer w1: v1(123.698,64.516) 123.698,26.162 139.319,10.541 P3.2
  Bottom Layer w1: R1.1 102.975,63.623 103.995,64.643 123.571,64.643 v1(123.698,64.516)
NetP4_2: P4.2 R7.1 R8.2 | length 10.1
  Bottom Layer w1: P4.2 151.892,10.287 153.375,11.77 R8.2 R7.1
NetP5_1: P5.1 P6.1 | length 43.5
  Bottom Layer w0.5: P6.1 39.624,127.889 43.815,123.698 73.66,123.698 76.835,126.873 P5.1
NetP5_2: P5.2 P6.2 | length 44.2
  Bottom Layer w0.5: P6.2 42.164,128.143 45.085,125.222 72.39,125.222 75.946,128.778 79.756,128.778 80.656,127.878 80.656,126.989 P5.2
NetP5_3: P5.3 P6.3 | length 44.4
  Bottom Layer w0.5: P6.3 44.704,128.397 45.974,127.127 71.755,127.127 75.184,130.556 81.407,130.556 83.312,128.651 P5.3
NetP7_2: P7.2 R16.1 | length 52.8
  Top Layer w1: v1(110.871,37.846) 110.871,20.955 113.411,18.415 113.411,5.307 113.38,5.275 P7.2@113.38,4.595
  Bottom Layer w1: R16.1 102.975,48.256 103.2,48.481 103.741,49.022 108.839,49.022 110.871,46.99 v1(110.871,37.846)
NetQ1_1: Q1.1 R1.2 R2.2 | length 5.4
  Bottom Layer w1: R1.2 101.113,63.285 101.113,60.944 101.163,60.894 103.889,60.894 R2.2
NetQ2_1: Q2.1 R4.2 R5.2 | length 5.6
  Bottom Layer w1: R4.2 101.025,76.057 101.075,76.007 Q2.1 101.208,75.999 103.992,75.999 R5.2
NetQ3_1: Q3.1 R16.2 R17.2 | length 5
  Bottom Layer w1: R16.2 101.113,47.918 101.113,45.831 101.163,45.781 Q3.1 ; Q3.1@101.276,45.781 101.326,45.731 103.834,45.731 R17.2@103.886,45.679
NetR13_2: R13.2 TP2.1 U1.3 | length 9
  Bottom Layer w1: TP2.1 159.766,102.524 R13.2 159.674,102.767 161.798,104.891 U1.3

## Polygon pours and split planes (outlines as drawn)
no net on Top Layer "NONET_L01_P001" (solid, remove dead copper, pour order 1): 0,0 0,135 200.025,135 200.025,0
GND on Top Layer "GND_L01_P000" (solid, remove dead copper, pour order 0): 0,0 0,135.001 199.898,135.001 199.898,0
GND on Bottom Layer "GND_L02_P00211" (solid, remove dead copper, pour order 2): 0,0 0,135 200.025,135 200.228,0

## Other copper
Top Layer:
  rectangle net GND: 178.816,95.377 187.579,106.934

## Silkscreen, mask and mechanical layers (free items; w line width, h text height)
Top Overlay:
  lines w0.254: 6.858,17.5 12.027,17.5 ; 7.62,67.5 11.938,67.5 ; 8.255,117.5 12.027,117.5 ; 73.241,18.415 73.241,20.358 ; 73.406,79.794 73.406,116.967
  text "3.3" at 40.132,122.047 h1.52 r90
  text "DIO" at 42.799,122.047 h1.52 r90
  text "CLC" at 45.466,121.793 h1.52 r90
  text "GND" at 48.133,121.793 h1.52 r90
Bottom Overlay:
  text "3.3" at 78.74,122.936 h1.52 r90
  text "DIO" at 81.407,122.936 h1.52 r90
  text "CLC" at 84.074,122.682 h1.52 r90
  text "GND" at 86.741,122.682 h1.52 r90
Mechanical 1:
  circle w0.013: c100,129.5 r1.5
  circle w0.013: c100,5.525 r1.5
  circle w0.254: c110,116.84 r6.197
  circle w0.013: c5.525,5.5 r1.5
  circle w0.013: c194.525,5.5 r1.5
  circle w0.013: c5.525,129.5 r1.5
  circle w0.013: c194.525,129.5 r1.5
  pour cut-out: 4.025,129.5 ccw(c5.525,129.5) 5.525,128 ccw(c5.525,129.5) 7.025,129.5 ccw(c5.525,129.5) 5.525,131 ccw(c5.525,129.5)
  lines w0.013: 195.025,0 ccw(c195.025,5) 200.025,5 200.025,130 ccw(c195.025,130) 195.052,135 5.025,135 ccw(c5.025,130) 0.025,130 0.025,5 ccw(c5.025,5) 5.025,0 195.05,0

## Text inside footprints (layer, text, board x,y; h text height)
LCD1: Top Overlay "GND" at 19.685,29.337 h1 r90; Top Overlay "VCC" at 22.225,29.337 h1 r90; Top Overlay "SDA" at 24.765,29.337 h1 r90; Top Overlay "SCL" at 27.432,29.21 h1 r90; Bottom Overlay "SCL" at 27.432,33.274 h1 r90; Bottom Overlay "SDA" at 24.765,33.528 h1 r90; Bottom Overlay "VCC" at 22.352,33.655 h1 r90; Bottom Overlay "GND" at 19.685,33.655 h1 r90
LED1: Top Overlay "K" at 97.54,58.73 h1; Mechanical 15 "K" at 97.54,58.73 h1
LED2: Top Overlay "K" at 97.54,73.73 h1; Mechanical 15 "K" at 97.54,73.73 h1
LED3: Top Overlay "K" at 128.73,87.46 h1 r270; Mechanical 15 "K" at 128.73,87.46 h1 r270
LED4: Top Overlay "K" at 143.73,87.46 h1 r270; Mechanical 15 "K" at 143.73,87.46 h1 r270
LED5: Top Overlay "K" at 158.73,87.46 h1 r270; Mechanical 15 "K" at 158.73,87.46 h1 r270
LED6: Top Overlay "K" at 173.73,87.46 h1 r270; Mechanical 15 "K" at 173.73,87.46 h1 r270
LED7: Top Overlay "K" at 128.73,72.46 h1 r270; Mechanical 15 "K" at 128.73,72.46 h1 r270
LED8: Top Overlay "K" at 143.73,72.46 h1 r270; Mechanical 15 "K" at 143.73,72.46 h1 r270
LED9: Top Overlay "K" at 158.73,72.46 h1 r270; Mechanical 15 "K" at 158.73,72.46 h1 r270
LED10: Top Overlay "K" at 173.73,72.46 h1 r270; Mechanical 15 "K" at 173.73,72.46 h1 r270
LED11: Top Overlay "K" at 128.73,57.46 h0.76 r270; Mechanical 15 "K" at 128.73,57.46 h0.76 r270
LED12: Top Overlay "K" at 143.73,57.46 h0.76 r270; Mechanical 15 "K" at 143.73,57.46 h0.76 r270
LED13: Top Overlay "K" at 158.73,57.46 h0.76 r270; Mechanical 15 "K" at 158.73,57.46 h0.76 r270
LED14: Top Overlay "K" at 173.73,57.46 h0.76 r270; Mechanical 15 "K" at 173.73,57.46 h0.76 r270
LED15: Top Overlay "K" at 128.73,42.46 h0.76 r270; Mechanical 15 "K" at 128.73,42.46 h0.76 r270
LED16: Top Overlay "K" at 143.73,42.46 h0.76 r270; Mechanical 15 "K" at 143.73,42.46 h0.76 r270
LED17: Top Overlay "K" at 158.73,42.46 h0.76 r270; Mechanical 15 "K" at 158.73,42.46 h0.76 r270
LED18: Top Overlay "K" at 173.73,42.46 h0.76 r270; Mechanical 15 "K" at 173.73,42.46 h0.76 r270
LED19: Top Overlay "K" at 97.54,43.73 h0.76; Mechanical 15 "K" at 97.54,43.73 h0.76